# Altium PCB EN2091_Analog_Project_PCB.PcbDoc (part 1 of 2)
Units mm, origin at the board's own origin, x right, y up, seen from the top; angles counter-clockwise.
Board outline 100.01 x 60.01 mm, 2 copper layers (Top Layer, Bottom Layer); 44 components, 26 nets, 123 pads, 280 vias.
Unrouted connection lines stored in the file: 15.
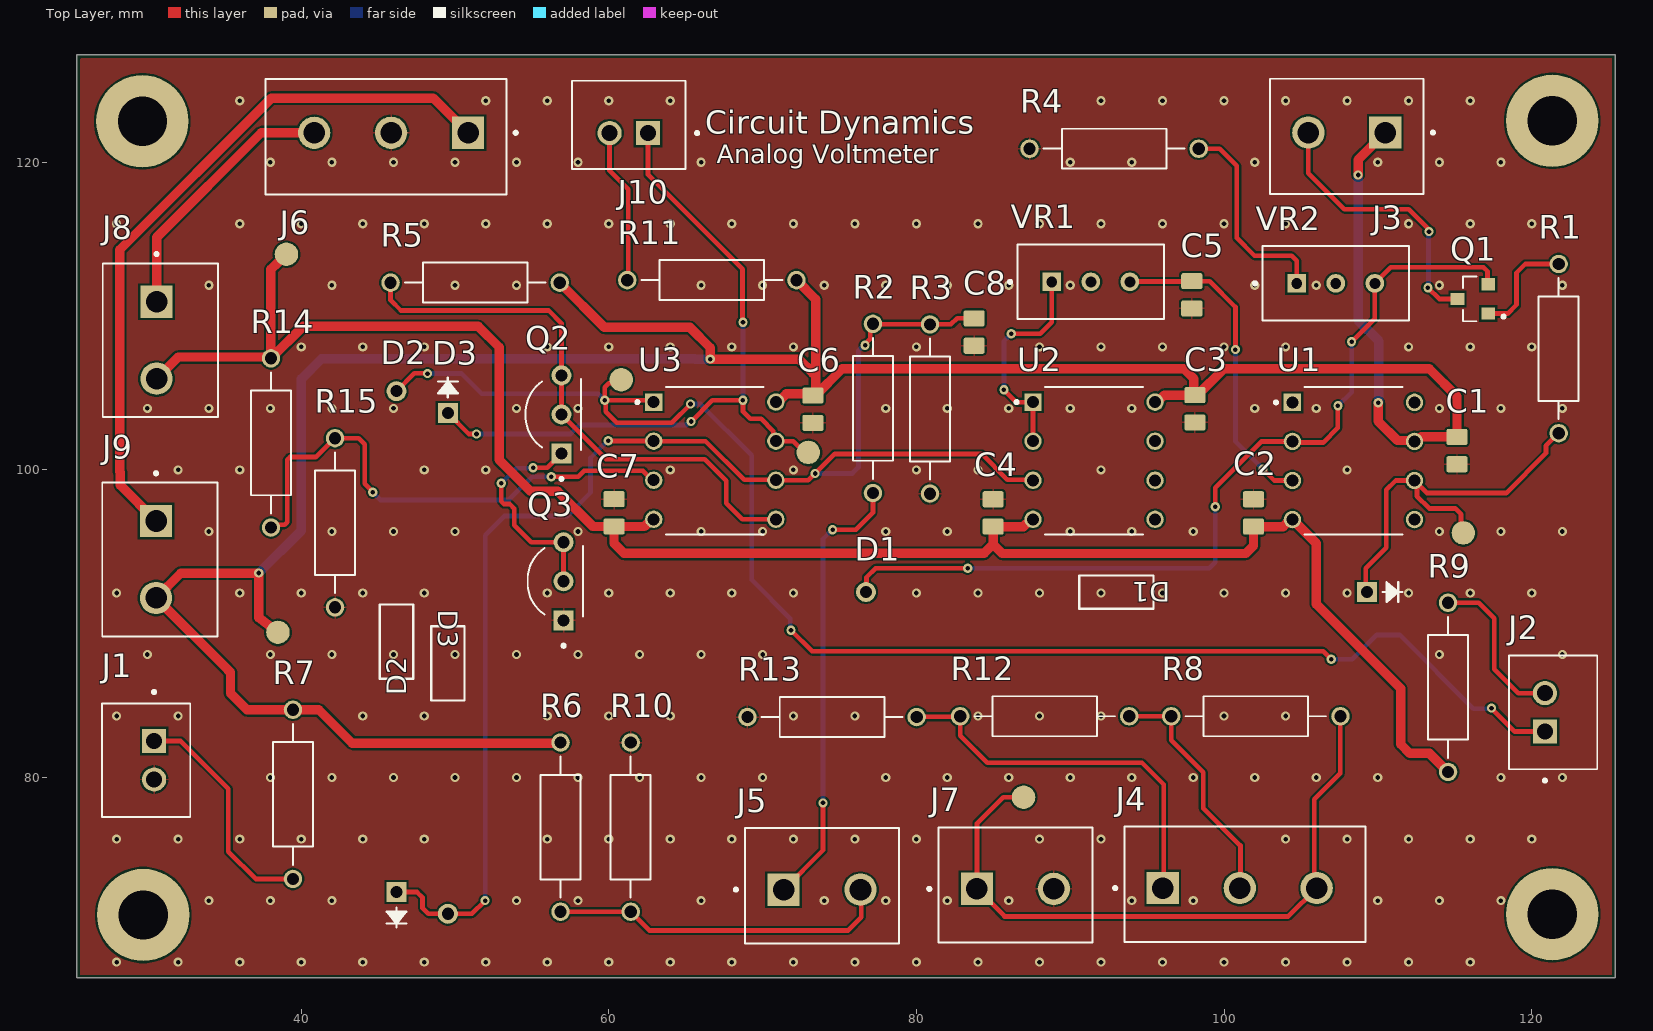
[diagram p0: Top Layer view]
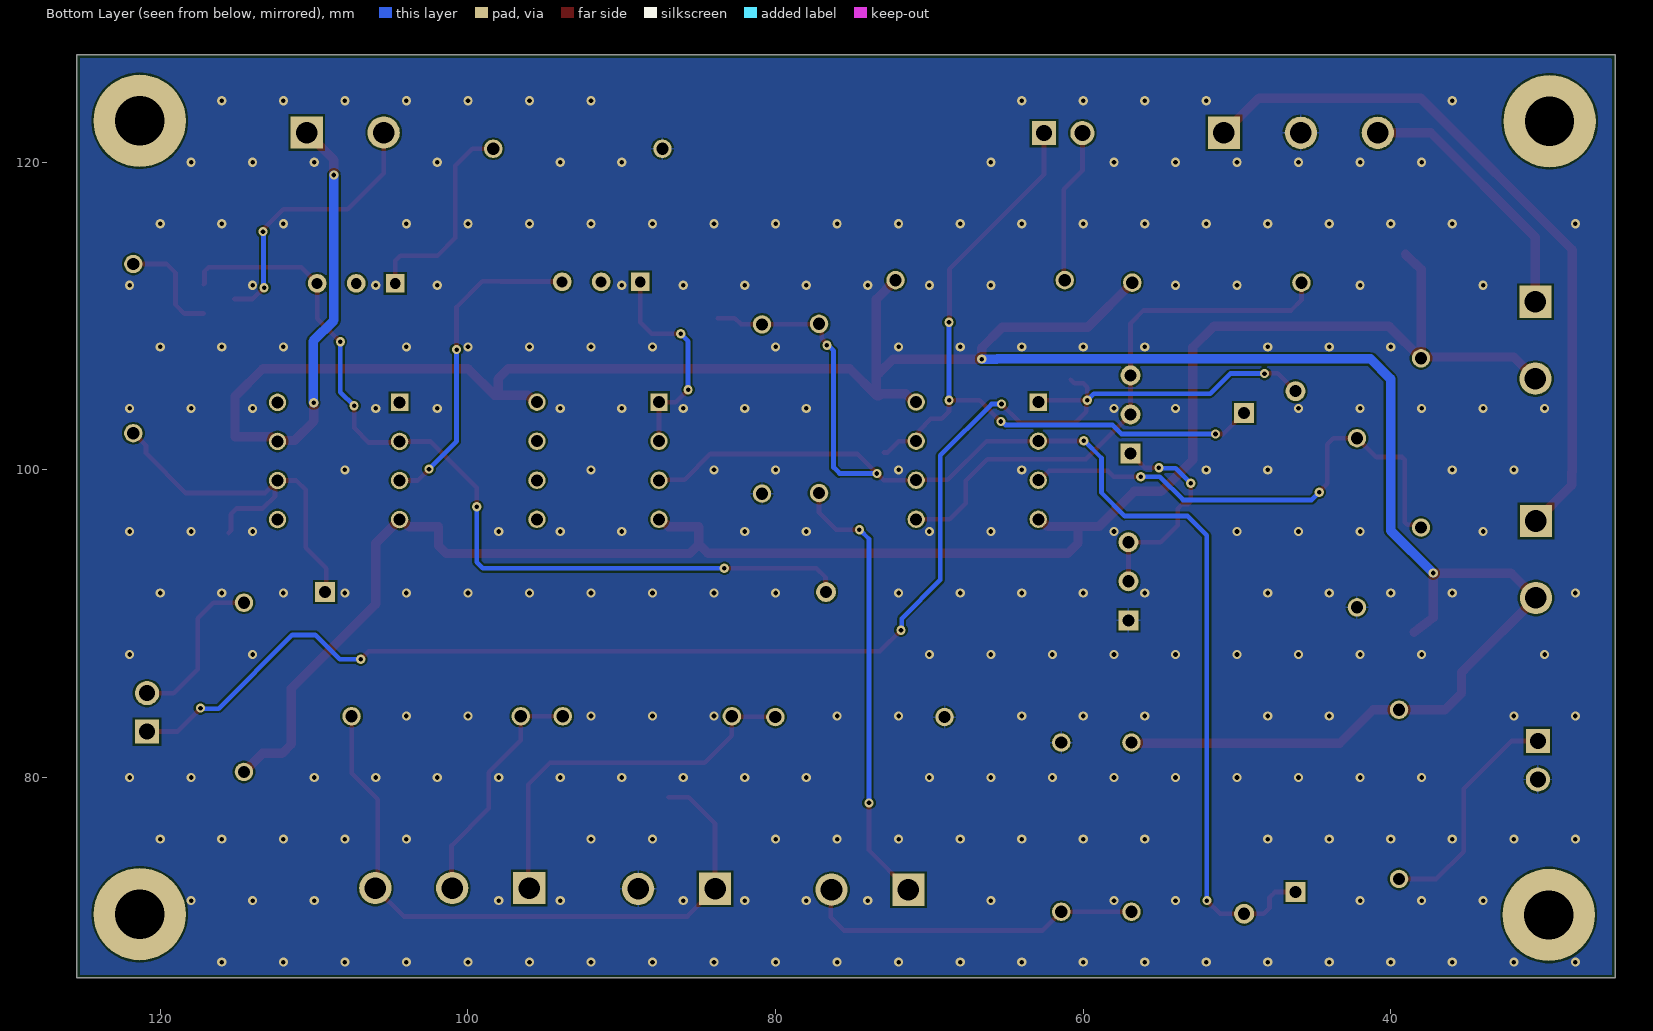
[diagram p1: Bottom Layer view, seen from below]

## Layer stack, top to bottom
Top Solder: solder mask 0.0102, Solder Resist, Dk 3.5
Top Layer: signal copper 0.0356
Dielectric 1: dielectric 0.32, FR-4, Dk 4.8
Bottom Layer: signal copper 0.0356
Bottom Solder: solder mask 0.0102, Solder Resist, Dk 3.5

## Board outline
25.419,66.977 25.419,126.982 25.418,126.983 125.425,126.983 125.425,66.977

## Design rules (kind name [scope] priority, off if disabled: settings)
BoardOutlineClearance [All] p1: gap=0.2 ignorepadtopadclearanceinfootprint=FALSE
Clearance [All] p1: gap=0.127 ignorepadtopadclearanceinfootprint=FALSE except(0.25: Arc-Hole Track-Hole SMDPad-Hole THPad-Hole Via-Hole Fill-Hole Poly-Hole Region-Hole Text-Hole)
ComponentClearance [All] p1: gap=0.127 collisioncheckmode=3 verticalgap=0.127 showdistances=TRUE
DiffPairsRouting [All] p1: maxlimit=0.254 minlimit=0.127 mostfreqgap=0.127 toplayer_minwidth=0.127 toplayer_maxwidth=25.4 toplayer_prefwidth=0.127 bottomlayer_minwidth=0.127 bottomlayer_maxwidth=25.4 bottomlayer_prefwidth=0.127 maxuncoupledlength=12.7
Height [All] p1: minheight=0 maxheight=1816.048 prefheight=12.7
HoleSize [All] p1: absolutevalues=TRUE maxlimit=6.3 minlimit=0.3 maxpercent=80.000 minpercent=20.000
HoleToHoleClearance [All] p1: gap=0.25 allowstackedmicrovias=FALSE
MinimumAnnularRing [All] p1: minimumring=0.076
MinimumSolderMaskSliver [All] p1: minsoldermaskwidth=0
PlaneClearance [All] p1: clearance=0.127
PlaneConnect PlaneConnectPowerPads [InPadClass('PowerPads')] p1: planeconnectstyle=Direct reliefexpansion=0.508 reliefentries=4 reliefconductorwidth=0.254 reliefairgap=0.254
PlaneConnect [All] p2: pad.planeconnectstyle=Relief pad.reliefexpansion=0.3 pad.reliefentries=4 pad.reliefconductorwidth=0.127 pad.reliefairgap=0.127 via.planeconnectstyle=Direct via.reliefexpansion=0.3 via.reliefentries=4 via.reliefconductorwidth=0.127 via.reliefairgap=0.127
PolygonConnect PolygonConnectPowerPads [All vs (InPadClass('PowerPads'))] p1: connectstyle=Direct reliefconductorwidth=0.254 reliefentries=4 polygonreliefangle="90 Angle" airgapwidth=0.254
PolygonConnect [All] p2: thpad.connectstyle=Relief thpad.reliefconductorwidth=0.127 thpad.reliefentries=4 thpad.polygonreliefangle="90 Angle" thpad.airgapwidth=0.127 smdpad.connectstyle=Relief smdpad.reliefconductorwidth=0.127 smdpad.reliefentries=4 smdpad.polygonreliefangle="90 Angle" smdpad.airgapwidth=0.127 via.connectstyle=Direct via.reliefconductorwidth=0.127 via.reliefentries=4 via.polygonreliefangle="90 Angle" via.airgapwidth=0.127
RoutingVias [All] p1: holewidth=0.3 width=0.6 viastyle="Through Hole" minholewidth=0.3 minwidth=0.6 maxholewidth=0.6 maxwidth=6.6
SilkToSilkClearance [All] p1: silktosilkclearance=0
SilkToSolderMaskClearance [IsPad] p1: minsilkscreentomaskgap=0.127 clearancetoexposedcopper=TRUE
SolderMaskExpansion [All] p1: expansion=0.075 istentingtop=FALSE
SupplyNets "Schematic Supply Nets_2" [InNet('GND')] p1: voltage=0.000
SupplyNets "Schematic Supply Nets_1" [InNet('+9V')] p2: voltage=0.000
SupplyNets "Schematic Supply Nets" [InNet('-9V')] p3: voltage=0.000
Width [All] p1: maxlimit=25.4 minlimit=0.127 preferedwidth=0.127 minimp=50.000000 maximp=50.000000 favimp=50.000000
20 further rules are at their usual default settings.

## Components (designator, comment, footprint, x,y, rotation, side; value= is the part's Value field where it differs from the comment)
C1 "100nF" CAPC2012X95N 115.145,101.259 r90 top
C2 "100nF" CAPC2012X95N 101.916,97.202 r90 top
C3 "100nF" CAPC2012X95N 98.109,103.975 r90 top
C4 "100nF" CAPC2012X95N 84.986,97.203 r90 top
C5 "1uF" CAPC2012X135N 97.904,111.385 r90 top
C6 "100nF" CAPC2012X95N 73.269,103.945 r90 top
C7 "100nF" CAPC2012X95N 60.341,97.211 r90 top
C8 "1uF" CAPC2012X135N 83.752,108.964 r90 top
D1 "1N4148" AXIAL_017AG_T26_ONS 109.282,92.058 r180 top
D2 "1N4148" AXIAL_017AG_T26_ONS 46.196,72.558 r90 top
D3 "1N4148" AXIAL_017AG_T26_ONS 49.537,103.705 r270 top
J1 "B2B-XH-A(LF)(SN)" JST_B2B-XH-A(LF)(SN) 29.913,81.123 r90 top
J2 "B2B-XH-A(LF)(SN)" JST_B2B-XH-A(LF)(SN) 121.389,84.239 r270 top
J3 "KF301-2P" HANDSON_KF301-2P 107.981,121.931 r180 top
J4 "KF301-5.0-3P-2P" HANDSON_KF301-3P 98.522,72.814 r0 top
J5 "KF301-2P" HANDSON_KF301-2P 73.863,72.714 r0 top
J6 "KF301-5.0-3P-2P" HANDSON_KF301-3P 48.347,121.92 r180 top
J7 "KF301-2P" HANDSON_KF301-2P 86.436,72.764 r0 top
J8 "KF301-2P" HANDSON_KF301-2P 30.599,108.435 r270 top
J9 "KF301-2P" HANDSON_KF301-2P 30.566,94.179 r270 top
J10 "B2B-XH-A(LF)(SN)" JST_B2B-XH-A(LF)(SN) 61.301,122.425 r0 top
Q1 "2N7002" TRANS_2N7002 116.174,111.115 r180 top
Q2 "2N3904" TO92254P460H750-3 56.921,103.605 r90 top
Q3 "2N3904" TO92254P460H750-3 57.059,92.759 r90 top
R1 "1kΩ" RESAD1100W55L680D260 121.756,107.888 r90 top
R2 "10kΩ" RESAD1100W55L680D260 77.172,103.997 r90 top
R3 "10MΩ" RESAD1100W55L680D260 80.882,103.961 r90 top
R4 "820Ω" RESAD1100W55L680D260 92.855,120.882 r0 top
R5 "47kΩ" RESAD1100W55L680D260 51.313,112.175 r180 top
R6 "180kΩ" RESAD1100W55L680D260 56.863,76.776 r90 top
R7 "4.7kΩ" RESAD1100W55L680D260 39.466,78.907 r270 top
R8 "2.7MΩ" RESAD1100W55L680D260 102.065,83.985 r0 top
R9 "2.2kΩ" RESAD1100W55L680D260 114.564,85.864 r90 top
R10 "20kΩ" RESAD1100W55L680D260 61.425,76.776 r270 top
R11 "2.2kΩ" RESAD1100W55L680D260 66.701,112.339 r180 top
R12 "200kΩ" RESAD1100W55L680D260 88.34,83.985 r0 top
R13 "100kΩ" RESAD1100W55L680D260 74.514,83.935 r0 top
R14 "100kΩ" RESAD1100W55L680D260 38.037,101.755 r90 top
R15 "820Ω" RESAD1100W55L680D260 42.201,96.562 r90 top
U1 "OP07CP" DIP794W45P254L959H508Q8 108.413,100.582 r0 top
U2 "TLO72CP" DIP794W45P254L959H508Q8 91.548,100.597 r0 top
U3 "TLO72CP" DIP794W45P254L959H508Q8 66.89,100.6 r0 top
VR1 "100kΩ" TRIM_3296W-1-104LF 91.338,112.228 r0 top
VR2 "100" TRIM_3296W-1-101 107.264,112.131 r0 top

## Footprints (in the part's own frame and the unit in brackets; to place one, negate y for a bottom-side part, rotate by r counter-clockwise, add the part's x,y. Pads: shape width x height; smd on the part's side, far side on the other; paste and mask are expansions set on the pad)
AXIAL_017AG_T26_ONS [mil]
  rect 51x51 hole 31 paste-99999 mask+0: 1(0,0)
  round 51 hole 31 paste-99999 mask+0: 2(1282,0)
  silkscreen extent -90,-42 736,43, body extent -11,-37 1292,37, height 75
CAPC2012X95N [mm]
  rrect25% 1.05x1.38 smd: 1(-0.888,0) 2(0.888,0)
  body extent -1,-0.63 1,0.63, height 0.95
CAPC2012X135N [mm]
  rrect25% 1.05x1.38 smd: 1(-0.888,0) 2(0.888,0)
  body extent -1,-0.63 1,0.63, height 1.35
DIP794W45P254L959H508Q8 [mm]
  rect 1.13x1.13 / inner round 1.13 / far side rect 1.13x1.13 hole 0.78 mask+0.102: 1(-3.97,3.81)
  round 1.13 hole 0.78 mask+0.102: 2(-3.97,1.27) 3(-3.97,-1.27) 4(-3.97,-3.81) 5(3.97,-3.81) 6(3.97,-1.27) 7(3.97,1.27) 8(3.97,3.81)
  silkscreen extent -5.13,-4.79 3.17,4.79, body extent -4.1,-4.79 4.1,4.79, height 5.08
HANDSON_KF301-2P [mm]
  rect 2.1x2.1 / inner round 2.1 / far side rect 2.1x2.1 hole 1.4: 1(-2.5,0)
  round 2.1 hole 1.4: 2(2.5,0)
  silkscreen extent -5.7,-3.5 5,4, body extent -5.6,-3.75 5,3.75, height 10
HANDSON_KF301-3P [mm]
  rect 2.1x2.1 / inner round 2.1 / far side rect 2.1x2.1 hole 1.4: 1(-2.5,0)
  round 2.1 hole 1.4: 2(2.5,0) 3(7.5,0)
  silkscreen extent -5.7,-3.5 10.67,4, body extent -5.6,-3.75 10.03,3.75, height 10
JST_B2B-XH-A(LF)(SN) [mm]
  rect 1.575x1.575 / inner round 1.575 / far side rect 1.575x1.575 hole 1.05: 1(1.25,-0.525)
  round 1.575 hole 1.05: 2(-1.25,-0.525)
  silkscreen extent -3.7,-2.88 4.54,2.88, body extent -3.7,-2.88 3.7,2.88, height 7
RESAD1100W55L680D260 [mm]
  round 1.2 hole 0.8: 1(-5.5,0) 2(5.5,0)
  silkscreen extent -4.58,-1.3 4.58,1.3, body extent -5.77,-1.2 5.77,1.2, height 2.4
TO92254P460H750-3 [mm]
  rect 1.298x1.298 / inner round 1.298 / far side rect 1.298x1.298 hole 0.79 mask+0.102: 1(-2.54,0)
  round 1.298 hole 0.79 mask+0.102: 2(0,0) 3(2.54,0)
  silkscreen extent -4.29,-1.27 2.3,2.33, body extent -2.74,-1.27 2.74,2.33, height 8.09
TRANS_2N7002 [mm]
  rect 0.9x0.8 smd paste+0 mask+0.102: 1(-1,0.95) 2(-1,-0.95) 3(1,0)
  silkscreen extent -2.1,-1.45 0.65,1.45, body extent -1.3,-1.52 1.3,1.52, height 1.3
TRIM_3296W-1-101 [mm]
  rect 1.218x1.218 / inner round 1.218 / far side rect 1.218x1.218 hole 0.71: 1(-2.54,0)
  round 1.218 hole 0.71: 2(0,0) 3(2.54,0)
  silkscreen extent -5.35,-2.41 4.76,2.42, body extent -4.76,-2.41 4.76,2.42, height 11.55
TRIM_3296W-1-104LF [mm]
  rect 1.218x1.218 / inner round 1.218 / far side rect 1.218x1.218 hole 0.71: 1(-2.54,0)
  round 1.218 hole 0.71: 2(0,0) 3(2.54,0)
  silkscreen extent -5.35,-2.41 4.76,2.42, body extent -4.76,-2.41 4.76,2.42, height 11.55

## Part data
C1 C2 C3 C4 C6 C7: library part CL21B104KBCNNNC, "100nF 50V X7R ±10% 0805 Multilayer Ceramic Capacitors MLCC - SMD/SMT ROHS", JLCPCB Part Number=C1711, Package="SMD-2 Samsung", Check_prices=https://www.snapeda.com/parts/CL21B104KBCNNNC/Samsung/view-part/?ref=eda, Datasheet=https://jlc-prod-smt.oss-eu-central-1.aliyuncs.com/smtDataManualFile/8586177282230652928-C1711.pdf?response-content-disposition=attachment%3B%20filename%3DC1711.pdf%3B%20filename%2A%3DUTF-8%27%27C1711.pdf&x-oss-date=20260824T081709Z&x-oss-expires=1800&x-oss-security-token=CAISgAN1q6Ft5B2yfSjIr5mGHfDOn7QT7o%2BxUBDlk1MZdulkpK3jlDz2IHhMdHJsAOodtv0%2FmmhT6PkclqRLcbhpcmfjV%2BZHzLB8qZEGg3sq557b16cNrbH4M4H6aXeirtuwDsz9SNTCALjPD3nPii50x5bjaDymRCbLGJaViJlhHLN1Ow6jdmhpCctxLAlvo9NgFxm3D%2Fu2NQPwiWf9FVdhvhEG6Vly8qOi2MaRmFy8yFTx0b0SvJ%2BjYMrmPctoN9JnSdC5mfdzau3a1TJ84gRD0a5wkaVA1zbDs5bfISEIuUzebreLqY03dV4mOvdqIcMe8qigz88fk%2FfIioH6xyxKOexoSCnFTOiiupCcQLPyao9jLu6iayqViY7QaIOTqQohZmkAMwVOasAsI3Ngh4zF97Qt0cVNkXO9gWfLI8DtuMleWgooUt9U86HD0eS19jklBdzSlusJRAJJUVBflCeKEaRNSAd3WGhEfM2%2BBt4QT30w5N2u00S8OSMI7RV3BqKWD5sagAGgO1DD6BoixGcj7OM8XS0gibNrLNvx9htutE794D0zttbwnpxTrwll4sF3BZcc4f4feWxI7%2Bt9GmtQtPB9CcN1OsLaOdxgI0xrNzXh3GP5koq13GIWxRMcGYuQFx2sstxck4NbO5PxcqvOTQCJgYZ8SZgvAsPo3E1SdW304xHJtyAA&x-oss-signature-version=OSS4-HMAC-SHA256&x-oss-credential=STS.NZ3VJzrk2YMZR6TwSLzfHKhHv%2F20260824%2Feu-central-1%2Foss%2Faliyun_v4_request&x-oss-signature=b522eb2391a6902924f48a327a7f41585dc420bf07b5c2db532034d436f7e6a7, LCSC Part Number=C1711, MF="Samsung Electro-Mechanics", MP=CL21B104KBCNNNC, Packaging=0805, SnapEDA_Link=https://www.snapeda.com/parts/CL21B104KBCNNNC/Samsung/view-part/?ref=snap
C5 C8: library part CL21B105KBFNNNE, "1uF 50V X7R ±10% 0805 Multilayer Ceramic Capacitors MLCC - SMD/SMT ROHS", JLCPCB Part Number=C28323, Package="SMD-2 Samsung", Check_prices=https://www.snapeda.com/parts/CL21B105KBFNNNE/Samsung/view-part/?ref=eda, LCSC Part Number=C28323, MF="Samsung Electro-Mechanics", MP=CL21B105KBFNNNE, Packaging=0805, SnapEDA_Link=https://www.snapeda.com/parts/CL21B105KBFNNNE/Samsung/view-part/?ref=snap
D1 D2 D3: "-55℃~+175℃@(Tj) 1 Independent 100V 1V@10mA 200mA 4A 4ns 500mW 5uA@75V DO-35 Switching Diodes ROHS", JLCPCB Part Number=C258182, Package="AXIAL LEAD-2 ON Semiconductor", Check_prices=https://www.snapeda.com/parts/1N4148/Onsemi/view-part/?ref=eda, ComponentLink1Description=Datasheet, ComponentLink1URL=https://jlc-prod-smt.oss-eu-central-1.aliyuncs.com/smtDataManualFile/8588891516693987328-C258182.pdf?response-content-disposition=attachment%3B%20filename%3DC258182.pdf%3B%20filename%2A%3DUTF-8%27%27C258182.pdf&x-oss-date=20260824T123915Z&x-oss-expires=1800&x-oss-security-token=CAISgAN1q6Ft5B2yfSjIr5nHLfzkqI4Zj7uFb1Hwr3kzdMRFu6LJ0Dz2IHhMdHJsAOodtv0%2FmmhT6PkclqRLcbhpcmfjV%2BZHzLB8qb4h%2FEIq557b16cNrbH4M4H6aXeirtuwDsz9SNTCALjPD3nPii50x5bjaDymRCbLGJaViJlhHLN1Ow6jdmhpCctxLAlvo9NgFxm3D%2Fu2NQPwiWf9FVdhvhEG6Vly8qOi2MaRmFy8yFTx0b0SvJ%2BjYMrmPctoN9JnSdC5mfdzau3a1TJ84gRD0a5wkaVA1zbDs5bfISEIuUzebreLqY03dV4mOvdqIcMe8qigz88fk%2FfIioH6xyxKOexoSCnFTOiiupCcQLPyao9jLu6iayqViY7QaIOTqQohZmkAMwVOasAsI3Ngh4zF97Qt0cVNkXO9gWfLI8DtuMleWkqnSf1c86HD0eS19jklBdzSlusJRAJJUVBflCeKEaRNSAd3WGhEfM2%2BBt4QT30w5N2u00S8OSMI7u2NB6KWD5sagAGr3foMo08u0hg4sPaEAhHejaX1K1vtCq0Rs3qdLPQjOHAU3bA2D2pDPhPzXRnKBDFNRw25yQAe0B8ZutJyzVczHfRc5aN9y5%2BVFQff1we5D3ylmkox3228fiPTPzdY0dulDcVIUusk1MruY%2FGuZ4TocXsP7T7%2BnIgiC75d%2B8yAUSAA&x-oss-signature-version=OSS4-HMAC-SHA256&x-oss-credential=STS.NZrfFPEQ88ynmwAKyfxKiTgb2%2F20260824%2Feu-central-1%2Foss%2Faliyun_v4_request&x-oss-signature=7d31f57c4ca03725e030b844e767f49808b97d5660530bc99b6cfe814330b3c1, LCSC Part Number=C258182, MF=onsemi, MP=1N4148, Packaging=DO-35, SnapEDA_Link=https://www.snapeda.com/parts/1N4148/Onsemi/view-part/?ref=snap
J1 J2 J10: "Connector Header Through Hole 2 position 0.098 (2.50mm)", JLCPCB Part Number=C51940134, Package=None, Check_prices=https://www.snapeda.com/parts/B2B-XH-A(LF)(SN)/JST/view-part/?ref=eda, ComponentLink1Description=Datasheet, ComponentLink1URL=https://jlc-prod-smt.oss-eu-central-1.aliyuncs.com/smtDataManualFile/8756873389292032000-C51940134.pdf?response-content-disposition=attachment%3B%20filename%3DC51940134.pdf%3B%20filename%2A%3DUTF-8%27%27C51940134.pdf&x-oss-date=20260825T073214Z&x-oss-expires=1800&x-oss-security-token=CAISgAN1q6Ft5B2yfSjIr5vHL4nsm71Gw%2FTYUEzanjcPNNsbqIb5oTz2IHhMdHJsAOodtv0%2FmmhT6PkclqRLcbhpcmfjV%2BZHzLB8qfZMiiAq557b16cNrbH4M4H6aXeirtuwDsz9SNTCALjPD3nPii50x5bjaDymRCbLGJaViJlhHLN1Ow6jdmhpCctxLAlvo9NgFxm3D%2Fu2NQPwiWf9FVdhvhEG6Vly8qOi2MaRmFy8yFTx0b0SvJ%2BjYMrmPctoN9JnSdC5mfdzau3a1TJ84gRD0a5wkaVA1zbDs5bfISEIuUzebreLqY03dV4mOvdqIcMe8qigz88fk%2FfIioH6xyxKOexoSCnFTOiiupCcQLPyao9jLu6iayqViY7QaIOTqQohZmkAMwVOasAsI3Ngh4zF97Qt0cVNkXO9gWfLI8DtuMleWmpmXdk%2B86HD0eS19jklBdzSlusJRAJJUVBflCeKEaRNSAd3WGhEfM2%2BBt4QT30w5N2u00S8OSMIxfnStaKWD5sagAGDiiDi0jkdUes8cqMbd0CGciys9ki7pIZkKsKqj9ZCxgmTVFKmonOvhB0GCq%2B31OjjHM0VTB2zOVgjvkRo1ZZOD%2FLtMbwaPXos31FS3eqvfpK6qEPBU1QuFMi8nemEpSEsfpKHEGo3PQQniW1S1jM94Dta3jYoawqx25WNx82BmSAA&x-oss-signature-version=OSS4-HMAC-SHA256&x-oss-credential=STS.NXrd3Xvbgt63Rjkz7Z8T7GCRC%2F20260825%2Feu-central-1%2Foss%2Faliyun_v4_request&x-oss-signature=ea0af44fa6bb8676878fee5e34cce7cfde54a6f68248ff1658e78184a3f7ef54, LCSC Part Number=C51940134, MF=XYECONN, MP=XY-B2B-XH-A, SnapEDA_Link=https://www.snapeda.com/parts/B2B-XH-A(LF)(SN)/JST/view-part/?ref=snap
J3 J5 J7 J8 J9: "2 Pin Terminal Block 5mm Pitch /  / -30℃~+120℃ 1 1.5 14~22 17A 1x2P 2 250V 2P 5mm Blue Through Hole 插件,P=5mm Screw Terminal Blocks ROHS", JLCPCB Part Number=C474881, Package=None, Check_prices=https://www.snapeda.com/parts/KF301-2P/Handson+Technology/view-part/?ref=eda, ComponentLink1Description=Datasheet, ComponentLink1URL=https://jlc-prod-smt.oss-eu-central-1.aliyuncs.com/smtDataManualFile/8588888669994561536-C474881.pdf?response-content-disposition=attachment%3B%20filename%3DC474881.pdf%3B%20filename%2A%3DUTF-8%27%27C474881.pdf&x-oss-date=20260825T075455Z&x-oss-expires=1800&x-oss-security-token=CAISgAN1q6Ft5B2yfSjIr5vHL4nsm71Gw%2FTYUEzanjcPNNsbqIb5oTz2IHhMdHJsAOodtv0%2FmmhT6PkclqRLcbhpcmfjV%2BZHzLB8qfZMiiAq557b16cNrbH4M4H6aXeirtuwDsz9SNTCALjPD3nPii50x5bjaDymRCbLGJaViJlhHLN1Ow6jdmhpCctxLAlvo9NgFxm3D%2Fu2NQPwiWf9FVdhvhEG6Vly8qOi2MaRmFy8yFTx0b0SvJ%2BjYMrmPctoN9JnSdC5mfdzau3a1TJ84gRD0a5wkaVA1zbDs5bfISEIuUzebreLqY03dV4mOvdqIcMe8qigz88fk%2FfIioH6xyxKOexoSCnFTOiiupCcQLPyao9jLu6iayqViY7QaIOTqQohZmkAMwVOasAsI3Ngh4zF97Qt0cVNkXO9gWfLI8DtuMleWmpmXdk%2B86HD0eS19jklBdzSlusJRAJJUVBflCeKEaRNSAd3WGhEfM2%2BBt4QT30w5N2u00S8OSMIxfnStaKWD5sagAGDiiDi0jkdUes8cqMbd0CGciys9ki7pIZkKsKqj9ZCxgmTVFKmonOvhB0GCq%2B31OjjHM0VTB2zOVgjvkRo1ZZOD%2FLtMbwaPXos31FS3eqvfpK6qEPBU1QuFMi8nemEpSEsfpKHEGo3PQQniW1S1jM94Dta3jYoawqx25WNx82BmSAA&x-oss-signature-version=OSS4-HMAC-SHA256&x-oss-credential=STS.NXrd3Xvbgt63Rjkz7Z8T7GCRC%2F20260825%2Feu-central-1%2Foss%2Faliyun_v4_request&x-oss-signature=bbaa85c5a5c7e0f3858a29c7e7e1ce60f942b031d33e9564a46d8b874bcb652f, LCSC Part Number=C474881, MF="Handson Technology", MP=KF301-2P, SnapEDA_Link=https://www.snapeda.com/parts/KF301-2P/Handson+Technology/view-part/?ref=snap
J4 J6: library part KF301-5.0-3P, "-30℃~+120℃ 1 1.5 14~22 17A 1x3P 250V 3 3P 5mm Blue Through Hole 插件,P=5mm Screw Terminal Blocks ROHS", JLCPCB Part Number=C474882, Package=None, ComponentLink1Description=Datasheet, ComponentLink1URL=https://jlc-prod-smt.oss-eu-central-1.aliyuncs.com/smtDataManualFile/8588888670002139136-C474882.pdf?response-content-disposition=attachment%3B%20filename%3DC474882.pdf%3B%20filename%2A%3DUTF-8%27%27C474882.pdf&x-oss-date=20260825T083909Z&x-oss-expires=1800&x-oss-security-token=CAISgAN1q6Ft5B2yfSjIr5rwIOuAjLBXwqqKMWTCgWMCOtsegaHIujz2IHhMdHJsAOodtv0%2FmmhT6PkclqRLcbhpcmfjV%2BZHzLB8qZALwSEq557b16cNrbH4M4H6aXeirtuwDsz9SNTCALjPD3nPii50x5bjaDymRCbLGJaViJlhHLN1Ow6jdmhpCctxLAlvo9NgFxm3D%2Fu2NQPwiWf9FVdhvhEG6Vly8qOi2MaRmFy8yFTx0b0SvJ%2BjYMrmPctoN9JnSdC5mfdzau3a1TJ84gRD0a5wkaVA1zbDs5bfISEIuUzebreLqY03dV4mOvdqIcMe8qigz88fk%2FfIioH6xyxKOexoSCnFTOiiupCcQLPyao9jLu6iayqViY7QaIOTqQohZmkAMwVOasAsI3Ngh4zF97Qt0cVNkXO9gWfLI8DtuMleWgrAlsTAJjvyAFpORa%2Bb5wchMHn6pr9EWOXuJZUIn3b%2FstWNupKq5ldctHSeoXq108CXVnU5PXYIxekA9aKWD5sagAEUyPntyVyU4V2IqafEejF6luaUGOW8giT03zBmI%2F4BLLNNju2GWhPwbRm8GlAGTmkaDwxIN4%2Bg6sd2cUpZg6tRnuiIoRrRfPgk9f8sDOnBhHkSyvlZEJc0XYnr%2F5yKzo8GBOg%2BMmFY724RtfEMwd4PQLZAoVJL30q4tKoTMBKqVSAA&x-oss-signature-version=OSS4-HMAC-SHA256&x-oss-credential=STS.NYEkQ4aovuha3BsecW6T2ndcX%2F20260825%2Feu-central-1%2Foss%2Faliyun_v4_request&x-oss-signature=8e8a3bf5e7e8f5cc52ed862cda921fd13cbe209f163a0669e8eafba254ac342d, LCSC Part Number=C474882, MF="Cixi Kefa Elec", MP=KF301-5.0-3P
Q1: "MOSFET, SOT-23, N, 60V, 0.28A, 5", JLCPCB Part Number=C8545, Package="SOT-23 Diotec", Check_prices=https://www.snapeda.com/parts/2N7002/Diotec/view-part/?ref=eda, ComponentLink1Description=Datasheet, ComponentLink1URL=https://jlc-prod-smt.oss-eu-central-1.aliyuncs.com/smtDataManualFile/8550724090240786432-C8545.pdf?response-content-disposition=attachment%3B%20filename%3DC8545.pdf%3B%20filename%2A%3DUTF-8%27%27C8545.pdf&x-oss-date=20260824T115715Z&x-oss-expires=1800&x-oss-security-token=CAISgAN1q6Ft5B2yfSjIr5nXMuv%2BvJV0wLuud0CI01ctdutUt%2FLArjz2IHhMdHJsAOodtv0%2FmmhT6PkclqRLcbhpcmfjV%2BZHzLB8qYl7pX0q557b16cNrbH4M4H6aXeirtuwDsz9SNTCALjPD3nPii50x5bjaDymRCbLGJaViJlhHLN1Ow6jdmhpCctxLAlvo9NgFxm3D%2Fu2NQPwiWf9FVdhvhEG6Vly8qOi2MaRmFy8yFTx0b0SvJ%2BjYMrmPctoN9JnSdC5mfdzau3a1TJ84gRD0a5wkaVA1zbDs5bfISEIuUzebreLqY03dV4mOvdqIcMe8qigz88fk%2FfIioH6xyxKOexoSCnFTOiiupCcQLPyao9jLu6iayqViY7QaIOTqQohZmkAMwVOasAsI3Ngh4zF97Qt0cVNkXO9gWfLI8DtuMleWorpROZs86HD0eS19jklBdzSlusJRAJJUVBflCeKEaRNSAd3WGhEfM2%2BBt4QT30w5N2u00S8OSMIdZUZHKKWD5sagAGIeDksTl0Jm8kDpNZyqXpos4Fia7krhozzbA5lHdi6hZhStnsllffk9Jy6LPikYdJXwHUZMD5tauOV%2FJMMuvlTmOopNPyucKakhx7CKF22jSXQNt5usakIFMasHgZAabS%2FMCHZQVcujW3F%2B80DFAHUjbh%2B1%2FCP8kr3l2njSUlPuCAA&x-oss-signature-version=OSS4-HMAC-SHA256&x-oss-credential=STS.NZbyQJQJUwyEuf97WxzdxX7kL%2F20260824%2Feu-central-1%2Foss%2Faliyun_v4_request&x-oss-signature=f53d934e69d13818cb32edbd0d068395a096e2f8396aa90dd858349e40b679ed, LCSC Part Number=C8545, MF="Diotec Semiconductor", MP=2N7002, Packaging=SOT-23, SnapEDA_Link=https://www.snapeda.com/parts/2N7002/Diotec/view-part/?ref=snap
Q2 Q3: "1 NPN 100 200mA 300MHz 300mV 40V 50nA 625mW 6V NPN TO-92 Bipolar (BJT) ROHS", JLCPCB Part Number=C118538, Package="TO-92 Diotec", Check_prices=https://www.snapeda.com/parts/2N3904/Diotec/view-part/?ref=eda, ComponentLink1Description=Datasheet, ComponentLink1URL=https://jlc-prod-smt.oss-eu-central-1.aliyuncs.com/smtDataManualFile/8588887652326387712-C118538.pdf?response-content-disposition=attachment%3B%20filename%3DC118538.pdf%3B%20filename%2A%3DUTF-8%27%27C118538.pdf&x-oss-date=20260911T151354Z&x-oss-expires=1800&x-oss-security-token=CAISgAN1q6Ft5B2yfSjIr5r9CI7lmOhw0YeyZVLIjkcBdcR9gfOa0Dz2IHhMdHJsAOodtv0%2FmmhT6PkclqRLcbhpcmfjV%2BZHzLB8qfNbr2kg557b16cNrbH4M4H6aXeirtuwDsz9SNTCALjPD3nPii50x5bjaDymRCbLGJaViJlhHLN1Ow6jdmhpCctxLAlvo9NgFxm3D%2Fu2NQPwiWf9FVdhvhEG6Vly8qOi2MaRmFy8yFTx0b0SvJ%2BjYMrmPctoN9JnSdC5mfdzau3a1TJ84gRD0a5wkaVA1zbDs5bfISEIuUzebreLqY03dV4mOvdqIcMe8qigz88fk%2FfIioH6xyxKOexoSCnFTOiiupCcQLPyao9jLu6iayqViY7QaIOTqQohZmkAMwVOasAsI3Ngh4zF97Qt0cVNkXO9gWfLI8DtuMleWmpsRHD7MjvyAFpORa%2Bb5wchMHn6pr9EWOXuJZUIn3b%2FstWNupKq5ldctHSeoXq108CXVnU5PXYIwBNhyqKWD5sagAG1Z1Ko3snZsjO1a1IJYsOspEmZv0%2BXU7OWdkAiwCQrcVVnAyAHbGZ8aZQx2jgys%2BVPP%2BjAliJD6sDK0ERwYbIs0pE%2F%2FOGQAkhN6WXgpQltR1W2sWSdxX5ATy6ua1TtneTFxF379HftCAEbgKOmHPbiz9tzW%2FV9N%2FCwVMnmnzFeoCAA&x-oss-signature-version=OSS4-HMAC-SHA256&x-oss-credential=STS.NYHC4Qu7QfEYgtyjGTyKQn612%2F20260911%2Feu-central-1%2Foss%2Faliyun_v4_request&x-oss-signature=5f7e3dfff60f0fba263af33bfa5ea5d7b517f9c0befd2510f0af956be3220f3d, LCSC Part Number=C118538, MF="Diotec Semiconductor", MP=2N3904, Packaging=TO-92, SnapEDA_Link=https://www.snapeda.com/parts/2N3904/Diotec/view-part/?ref=snap
R1: library part MFR-25FTE52-1K, "-55℃~+155℃ 1kΩ 250mW Metal Film Resistor ±1% ±50ppm/℃ 插件,D2.4xL6.3mm Through Hole Resistors ROHS", JLCPCB Part Number=C172978, Manufacturer=YAGEO, Package=Plugin,D2.4xL6.3mm, ComponentLink1Description=Footprint, ComponentLink1URL=https://jlc-prod-smt.oss-eu-central-1.aliyuncs.com/smtDataManualFile/8755423044993605632-C172978.pdf?response-content-disposition=attachment%3B%20filename%3DC172978.pdf%3B%20filename%2A%3DUTF-8%27%27C172978.pdf&x-oss-date=20260906T111132Z&x-oss-expires=1800&x-oss-security-token=CAISgAN1q6Ft5B2yfSjIr5nac%2Bnsjo1T4LGgNU%2FHnTM8eNdtpKDsuzz2IHhMdHJsAOodtv0%2FmmhT6PkclqRLcbhpcmfjV%2BZHzLB8qaYz1FQu557b16cNrbH4M4H6aXeirtuwDsz9SNTCALjPD3nPii50x5bjaDymRCbLGJaViJlhHLN1Ow6jdmhpCctxLAlvo9NgFxm3D%2Fu2NQPwiWf9FVdhvhEG6Vly8qOi2MaRmFy8yFTx0b0SvJ%2BjYMrmPctoN9JnSdC5mfdzau3a1TJ84gRD0a5wkaVA1zbDs5bfISEIuUzebreLqY03dV4mOvdqIcMe8qigz88fk%2FfIioH6xyxKOexoSCnFTOiiupCcQLPyao9jLu6iayqViY7QaIOTqQohZmkAMwVOasAsI3Ngh4zF97Qt0cVNkXO9gWfLI8DtuMleWspmx%2Fhm46HD0eS19jklBdzSlusJRAJJUVBflCeKEaRNSAd3WGhEfM2%2BBt4QT30w5N2u00S8OSMImLNMX6KWD5sagAGnBS1pJyigTrIAotemE2%2FZAj5lpuflU6Cx1ne3PKYeUSgx29L1tnEKEw7bHJH4L%2BwcyBF5TIPkAe9wQLoDG2IH%2B7vbpIM5MvPYfjzBbZEibCKyAmKr6BN784HCib%2BC8bhBZ5WQgh34wHbh24tRPUkJ5x6XXfvl0zb7VCnsoRLFQiAA&x-oss-signature-version=OSS4-HMAC-SHA256&x-oss-credential=STS.NZo8SXcRrWsK7ivy3itXAKeGY%2F20260906%2Feu-central-1%2Foss%2Faliyun_v4_request&x-oss-signature=4a93038927de780a1167e2fdc17bc64734a2c7f8ed724f4b04540bf5e082abb1, LCSC Part Number=C172978, Manufacturer Part Number=MFR-25FTE52-1K
R2: library part MFR-25FTE52-10K, "10kΩ 250V 250mW Metal Film Resistor ±1% ±50ppm/℃ 插件,D2.2xL6.5mm Through Hole Resistors ROHS", JLCPCB Part Number=C172967, Manufacturer=YAGEO, ComponentLink1Description=Footprint, ComponentLink1URL=https://jlc-prod-smt.oss-eu-central-1.aliyuncs.com/smtDataManualFile/8588887064650141696-C57436.pdf?response-content-disposition=attachment%3B%20filename%3DC57436.pdf%3B%20filename%2A%3DUTF-8%27%27C57436.pdf&x-oss-date=20260906T101707Z&x-oss-expires=1800&x-oss-security-token=CAISgAN1q6Ft5B2yfSjIr5vSO4%2FhhZxI%2Bq2YSHX0pTQQY%2BQe2%2FboiDz2IHhMdHJsAOodtv0%2FmmhT6PkclqRLcbhpcmfjV%2BZHzLB8qZREnVcu557b16cNrbH4M4H6aXeirtuwDsz9SNTCALjPD3nPii50x5bjaDymRCbLGJaViJlhHLN1Ow6jdmhpCctxLAlvo9NgFxm3D%2Fu2NQPwiWf9FVdhvhEG6Vly8qOi2MaRmFy8yFTx0b0SvJ%2BjYMrmPctoN9JnSdC5mfdzau3a1TJ84gRD0a5wkaVA1zbDs5bfISEIuUzebreLqY03dV4mOvdqIcMe8qigz88fk%2FfIioH6xyxKOexoSCnFTOiiupCcQLPyao9jLu6iayqViY7QaIOTqQohZmkAMwVOasAsI3Ngh4zF97Qt0cVNkXO9gWfLI8DtuMleWgpiXuNG46HD0eS19jklBdzSlusJRAJJUVBflCeKEaRNSAd3WGhEfM2%2BBt4QT30w5N2u00S8OSMIYHF9RqKWD5sagAGbau%2Fxe%2BD2roMehcOdm0PLMv7W398Wd9qW6auWIGOJ8yM2mufMKnNuzKDZRrB2n8xqRfVoivNI%2BCfeVUSVLsJDjlvzZ31AQToMdhBOrAOSV9wuJpTD8m86LQRz159fZvu2CuBzwfmd%2B8wbWeOtwDoLyWx%2Bd%2F0Ka0FLrv%2FIvuL9IyAA&x-oss-signature-version=OSS4-HMAC-SHA256&x-oss-credential=STS.NXgp5UhCiMosJSEA4Eok243Cj%2F20260906%2Feu-central-1%2Foss%2Faliyun_v4_request&x-oss-signature=a373059562e0e3dfbc50b7320e961e4699e31ef87cd4af9f5203c76fec99a3de, LCSC Part Number=C172967, Manufacturer Part Number=MFR-25FTE52-10K, Package=https://jlc-prod-smt.oss-eu-central-1.aliyuncs.com/smtDataManualFile/8755418945577209856-C172967.pdf?response-content-disposition=attachment%3B%20filename%3DC172967.pdf%3B%20filename%2A%3DUTF-8%27%27C172967.pdf&x-oss-date=20260906T105853Z&x-oss-expires=1800&x-oss-security-token=CAISgAN1q6Ft5B2yfSjIr5vSO4%2FhhZxI%2Bq2YSHX0pTQQY%2BQe2%2FboiDz2IHhMdHJsAOodtv0%2FmmhT6PkclqRLcbhpcmfjV%2BZHzLB8qZREnVcu557b16cNrbH4M4H6aXeirtuwDsz9SNTCALjPD3nPii50x5bjaDymRCbLGJaViJlhHLN1Ow6jdmhpCctxLAlvo9NgFxm3D%2Fu2NQPwiWf9FVdhvhEG6Vly8qOi2MaRmFy8yFTx0b0SvJ%2BjYMrmPctoN9JnSdC5mfdzau3a1TJ84gRD0a5wkaVA1zbDs5bfISEIuUzebreLqY03dV4mOvdqIcMe8qigz88fk%2FfIioH6xyxKOexoSCnFTOiiupCcQLPyao9jLu6iayqViY7QaIOTqQohZmkAMwVOasAsI3Ngh4zF97Qt0cVNkXO9gWfLI8DtuMleWgpiXuNG46HD0eS19jklBdzSlusJRAJJUVBflCeKEaRNSAd3WGhEfM2%2BBt4QT30w5N2u00S8OSMIYHF9RqKWD5sagAGbau%2Fxe%2BD2roMehcOdm0PLMv7W398Wd9qW6auWIGOJ8yM2mufMKnNuzKDZRrB2n8xqRfVoivNI%2BCfeVUSVLsJDjlvzZ31AQToMdhBOrAOSV9wuJpTD8m86LQRz159fZvu2CuBzwfmd%2B8wbWeOtwDoLyWx%2Bd%2F0Ka0FLrv%2FIvuL9IyAA&x-oss-signature-version=OSS4-HMAC-SHA256&x-oss-credential=STS.NXgp5UhCiMosJSEA4Eok243Cj%2F20260906%2Feu-central-1%2Foss%2Faliyun_v4_request&x-oss-signature=027985dfe1697d3c93addd91df9663f85f41fcc0b4f91978383751338c84ded9
R3: library part HHV-25FR-52-10M, "-55℃~+155℃ 1.6kV 10MΩ 250mW Metal Film Resistors ±1% ±200ppm/℃ 插件,D2.4xL6.3mm Through Hole Resistors ROHS", JLCPCB Part Number=C1741175, Manufacturer=YAGEO, Package=Plugin,D2.4xL6.3mm, ComponentLink1Description=Footprint, ComponentLink1URL=https://jlc-prod-smt.oss-eu-central-1.aliyuncs.com/smtDataManualFile/8755328648436031488-C1741175.pdf?response-content-disposition=attachment%3B%20filename%3DC1741175.pdf%3B%20filename%2A%3DUTF-8%27%27C1741175.pdf&x-oss-date=20260906T094949Z&x-oss-expires=1800&x-oss-security-token=CAISgAN1q6Ft5B2yfSjIr5rWeez%2Fv7lC0IiPa1bwvEoAT71Ol5bD1zz2IHhMdHJsAOodtv0%2FmmhT6PkclqRLcbhpcmfjV%2BZHzLB8qb4bx1Eu557b16cNrbH4M4H6aXeirtuwDsz9SNTCALjPD3nPii50x5bjaDymRCbLGJaViJlhHLN1Ow6jdmhpCctxLAlvo9NgFxm3D%2Fu2NQPwiWf9FVdhvhEG6Vly8qOi2MaRmFy8yFTx0b0SvJ%2BjYMrmPctoN9JnSdC5mfdzau3a1TJ84gRD0a5wkaVA1zbDs5bfISEIuUzebreLqY03dV4mOvdqIcMe8qigz88fk%2FfIioH6xyxKOexoSCnFTOiiupCcQLPyao9jLu6iayqViY7QaIOTqQohZmkAMwVOasAsI3Ngh4zF97Qt0cVNkXO9gWfLI8DtuMleWkonxNcG46HD0eS19jklBdzSlusJRAJJUVBflCeKEaRNSAd3WGhEfM2%2BBt4QT30w5N2u00S8OSMInBxK8qKWD5sagAE4UE4gskISDgkkmUOAOqQkmxDERSgRapehmtIyqiUnmINqf%2Fe7mduu7Yr1h7WdN14VCvYzNhyIHZnwotTufqqI9gqQmPxd7MybCmWa9YrQOa6FH4HxAfg%2FPn30MZ%2BuqC8fyTltcZzXzlZfTkArX8MWh2hCnLGuQWVjeheR9INpwyAA&x-oss-signature-version=OSS4-HMAC-SHA256&x-oss-credential=STS.NYc2VKRfcgJdipAXJUC2bxSh5%2F20260906%2Feu-central-1%2Foss%2Faliyun_v4_request&x-oss-signature=c9bb8ade5495b9c36b4e24ae95a96a0ffed89de77ee1bfec24146fbeec18ca78, LCSC Part Number=C1741175, Manufacturer Part Number=HHV-25FR-52-10M
R4 R15: library part MFR-25FRF52-820R, "-55℃~+155℃ 250mW 820Ω Metal Film Resistor ±1% ±100ppm/℃ 插件,D2.4xL6.3mm Through Hole Resistors ROHS", JLCPCB Part Number=C1743583, Manufacturer=YAGEO, Package=Plugin,D2.4xL6.3mm, ComponentLink1Description=Footprint, ComponentLink1URL=https://jlc-prod-smt.oss-eu-central-1.aliyuncs.com/smtDataManualFile/8755394679539929088-C1743583.pdf?response-content-disposition=attachment%3B%20filename%3DC1743583.pdf%3B%20filename%2A%3DUTF-8%27%27C1743583.pdf&x-oss-date=20260906T111339Z&x-oss-expires=1800&x-oss-security-token=CAISgAN1q6Ft5B2yfSjIr5nac%2Bnsjo1T4LGgNU%2FHnTM8eNdtpKDsuzz2IHhMdHJsAOodtv0%2FmmhT6PkclqRLcbhpcmfjV%2BZHzLB8qaYz1FQu557b16cNrbH4M4H6aXeirtuwDsz9SNTCALjPD3nPii50x5bjaDymRCbLGJaViJlhHLN1Ow6jdmhpCctxLAlvo9NgFxm3D%2Fu2NQPwiWf9FVdhvhEG6Vly8qOi2MaRmFy8yFTx0b0SvJ%2BjYMrmPctoN9JnSdC5mfdzau3a1TJ84gRD0a5wkaVA1zbDs5bfISEIuUzebreLqY03dV4mOvdqIcMe8qigz88fk%2FfIioH6xyxKOexoSCnFTOiiupCcQLPyao9jLu6iayqViY7QaIOTqQohZmkAMwVOasAsI3Ngh4zF97Qt0cVNkXO9gWfLI8DtuMleWspmx%2Fhm46HD0eS19jklBdzSlusJRAJJUVBflCeKEaRNSAd3WGhEfM2%2BBt4QT30w5N2u00S8OSMImLNMX6KWD5sagAGnBS1pJyigTrIAotemE2%2FZAj5lpuflU6Cx1ne3PKYeUSgx29L1tnEKEw7bHJH4L%2BwcyBF5TIPkAe9wQLoDG2IH%2B7vbpIM5MvPYfjzBbZEibCKyAmKr6BN784HCib%2BC8bhBZ5WQgh34wHbh24tRPUkJ5x6XXfvl0zb7VCnsoRLFQiAA&x-oss-signature-version=OSS4-HMAC-SHA256&x-oss-credential=STS.NZo8SXcRrWsK7ivy3itXAKeGY%2F20260906%2Feu-central-1%2Foss%2Faliyun_v4_request&x-oss-signature=233dab8b7b4060aecf0cba190d8c40d32b47362045e2275f98ec60f582b2fb12, LCSC Part Number=C1743583, Manufacturer Part Number=MFR-25FRF52-820R
R5: library part MFR-25FTE52-47K, "-55℃~+155℃ 250mW 47kΩ Metal Film Resistor ±1% ±50ppm/℃ 插件,D2.4xL6.3mm Through Hole Resistors ROHS", JLCPCB Part Number=C173021, Manufacturer=YAGEO, Package=Plugin,D2.4xL6.3mm, ComponentLink1Description=Footprint, ComponentLink1URL=https://jlc-prod-smt.oss-eu-central-1.aliyuncs.com/smtDataManualFile/8588890296134881280-C173021.pdf?response-content-disposition=attachment%3B%20filename%3DC173021.pdf%3B%20filename%2A%3DUTF-8%27%27C173021.pdf&x-oss-date=20260911T155232Z&x-oss-expires=1800&x-oss-security-token=CAISgAN1q6Ft5B2yfSjIr5r9CI7lmOhw0YeyZVLIjkcBdcR9gfOa0Dz2IHhMdHJsAOodtv0%2FmmhT6PkclqRLcbhpcmfjV%2BZHzLB8qfNbr2kg557b16cNrbH4M4H6aXeirtuwDsz9SNTCALjPD3nPii50x5bjaDymRCbLGJaViJlhHLN1Ow6jdmhpCctxLAlvo9NgFxm3D%2Fu2NQPwiWf9FVdhvhEG6Vly8qOi2MaRmFy8yFTx0b0SvJ%2BjYMrmPctoN9JnSdC5mfdzau3a1TJ84gRD0a5wkaVA1zbDs5bfISEIuUzebreLqY03dV4mOvdqIcMe8qigz88fk%2FfIioH6xyxKOexoSCnFTOiiupCcQLPyao9jLu6iayqViY7QaIOTqQohZmkAMwVOasAsI3Ngh4zF97Qt0cVNkXO9gWfLI8DtuMleWmpsRHD7MjvyAFpORa%2Bb5wchMHn6pr9EWOXuJZUIn3b%2FstWNupKq5ldctHSeoXq108CXVnU5PXYIwBNhyqKWD5sagAG1Z1Ko3snZsjO1a1IJYsOspEmZv0%2BXU7OWdkAiwCQrcVVnAyAHbGZ8aZQx2jgys%2BVPP%2BjAliJD6sDK0ERwYbIs0pE%2F%2FOGQAkhN6WXgpQltR1W2sWSdxX5ATy6ua1TtneTFxF379HftCAEbgKOmHPbiz9tzW%2FV9N%2FCwVMnmnzFeoCAA&x-oss-signature-version=OSS4-HMAC-SHA256&x-oss-credential=STS.NYHC4Qu7QfEYgtyjGTyKQn612%2F20260911%2Feu-central-1%2Foss%2Faliyun_v4_request&x-oss-signature=a5211158e981f6f286d02bf7e97af59763eebf01b0968d730475d1dfdb7d4155, LCSC Part Number=C173021, Manufacturer Part Number=MFR-25FTE52-47K
R6: library part MFR0W4F1803A50, "180kΩ 250V 250mW Metal Film Resistor ±1% ±50ppm/℃ 插件,D2.2xL6.5mm Through Hole Resistors ROHS", JLCPCB Part Number=C58666, Manufacturer="UNI-ROYAL(Uniroyal Elec)", Package=Plugin,D2.2xL6.5mm, ComponentLink1Description=Footprint, ComponentLink1URL=https://jlc-prod-smt.oss-eu-central-1.aliyuncs.com/smtDataManualFile/8588887077518131200-C58666.pdf?response-content-disposition=attachment%3B%20filename%3DC58666.pdf%3B%20filename%2A%3DUTF-8%27%27C58666.pdf&x-oss-date=20260906T133700Z&x-oss-expires=1800&x-oss-security-token=CAISgAN1q6Ft5B2yfSjIr5njeuLttaVw4q%2B4Y1bUtGEyaP1Ohojzpzz2IHhMdHJsAOodtv0%2FmmhT6PkclqRLcbhpcmfjV%2BZHzLB8qcIq%2BVsu557b16cNrbH4M4H6aXeirtuwDsz9SNTCALjPD3nPii50x5bjaDymRCbLGJaViJlhHLN1Ow6jdmhpCctxLAlvo9NgFxm3D%2Fu2NQPwiWf9FVdhvhEG6Vly8qOi2MaRmFy8yFTx0b0SvJ%2BjYMrmPctoN9JnSdC5mfdzau3a1TJ84gRD0a5wkaVA1zbDs5bfISEIuUzebreLqY03dV4mOvdqIcMe8qigz88fk%2FfIioH6xyxKOexoSCnFTOiiupCcQLPyao9jLu6iayqViY7QaIOTqQohZmkAMwVOasAsI3Ngh4zF97Qt0cVNkXO9gWfLI8DtuMleWqqk1co246HD0eS19jklBdzSlusJRAJJUVBflCeKEaRNSAd3WGhEfM2%2BBt4QT30w5N2u00S8OSMI7tiySaKWD5sagAFyBZ5nSLToOyW0z7C6S%2FMhpew6OezDiPqRMvx66XY9pS51uwdfsn2wi8yZTg9CqHuYkXf4ZXXcjvLCic5ESOd8%2FwIG4uNqRu1t5MbTbrQSd8TFmyIZT1C90epqdNW1JOA2EkooiEEU8ixLOdR1Etq5%2FomnsGPRVTeksDljQCjjiiAA&x-oss-signature-version=OSS4-HMAC-SHA256&x-oss-credential=STS.NZV1XYXzQUmSapePagdrbiMXE%2F20260906%2Feu-central-1%2Foss%2Faliyun_v4_request&x-oss-signature=4b93cb7cff9be7ef9c8b15ae901b43c734fd53e4648c1a05799116552e2faa13, LCSC Part Number=C58666, Manufacturer Part Number=MFR0W4F1803A50
R7: library part MFR-25FTE52-4K7, "-55℃~+155℃ 250mW 4.7kΩ Metal Film Resistor ±1% ±50ppm/℃ 插件,D2.4xL6.3mm Through Hole Resistors ROHS", JLCPCB Part Number=C173023, Manufacturer=YAGEO, Package=Plugin,D2.4xL6.3mm, ComponentLink1Description=Footprint, ComponentLink1URL=https://jlc-prod-smt.oss-eu-central-1.aliyuncs.com/smtDataManualFile/8771707749107277824-C173023.pdf?response-content-disposition=attachment%3B%20filename%3DC173023.pdf%3B%20filename%2A%3DUTF-8%27%27C173023.pdf&x-oss-date=20260906T110137Z&x-oss-expires=1800&x-oss-security-token=CAISgAN1q6Ft5B2yfSjIr5vSO4%2FhhZxI%2Bq2YSHX0pTQQY%2BQe2%2FboiDz2IHhMdHJsAOodtv0%2FmmhT6PkclqRLcbhpcmfjV%2BZHzLB8qZREnVcu557b16cNrbH4M4H6aXeirtuwDsz9SNTCALjPD3nPii50x5bjaDymRCbLGJaViJlhHLN1Ow6jdmhpCctxLAlvo9NgFxm3D%2Fu2NQPwiWf9FVdhvhEG6Vly8qOi2MaRmFy8yFTx0b0SvJ%2BjYMrmPctoN9JnSdC5mfdzau3a1TJ84gRD0a5wkaVA1zbDs5bfISEIuUzebreLqY03dV4mOvdqIcMe8qigz88fk%2FfIioH6xyxKOexoSCnFTOiiupCcQLPyao9jLu6iayqViY7QaIOTqQohZmkAMwVOasAsI3Ngh4zF97Qt0cVNkXO9gWfLI8DtuMleWgpiXuNG46HD0eS19jklBdzSlusJRAJJUVBflCeKEaRNSAd3WGhEfM2%2BBt4QT30w5N2u00S8OSMIYHF9RqKWD5sagAGbau%2Fxe%2BD2roMehcOdm0PLMv7W398Wd9qW6auWIGOJ8yM2mufMKnNuzKDZRrB2n8xqRfVoivNI%2BCfeVUSVLsJDjlvzZ31AQToMdhBOrAOSV9wuJpTD8m86LQRz159fZvu2CuBzwfmd%2B8wbWeOtwDoLyWx%2Bd%2F0Ka0FLrv%2FIvuL9IyAA&x-oss-signature-version=OSS4-HMAC-SHA256&x-oss-credential=STS.NXgp5UhCiMosJSEA4Eok243Cj%2F20260906%2Feu-central-1%2Foss%2Faliyun_v4_request&x-oss-signature=1116386aafb13c20a043ea06afd77c1f1d1df21e84b4082c77487c423f4e3d47, LCSC Part Number=C173023, Manufacturer Part Number=MFR-25FTE52-4K7
R8: library part MF0W4FF2704A50, "2.7MΩ 250V 250mW Metal Film Resistor ±1% ±50ppm/℃ 插件,D2.2xL6.5mm Through Hole Resistors ROHS", JLCPCB Part Number=C2991790, Manufacturer="UNI-ROYAL(Uniroyal Elec)", Package=Plugin,D2.2xL6.5mm, ComponentLink1Description=Footprint, ComponentLink1URL=https://jlc-prod-smt.oss-eu-central-1.aliyuncs.com/smtDataManualFile/8756509401370759168-C2991790.pdf?response-content-disposition=attachment%3B%20filename%3DC2991790.pdf%3B%20filename%2A%3DUTF-8%27%27C2991790.pdf&x-oss-date=20260906T100154Z&x-oss-expires=1800&x-oss-security-token=CAISgAN1q6Ft5B2yfSjIr5rWeez%2Fv7lC0IiPa1bwvEoAT71Ol5bD1zz2IHhMdHJsAOodtv0%2FmmhT6PkclqRLcbhpcmfjV%2BZHzLB8qb4bx1Eu557b16cNrbH4M4H6aXeirtuwDsz9SNTCALjPD3nPii50x5bjaDymRCbLGJaViJlhHLN1Ow6jdmhpCctxLAlvo9NgFxm3D%2Fu2NQPwiWf9FVdhvhEG6Vly8qOi2MaRmFy8yFTx0b0SvJ%2BjYMrmPctoN9JnSdC5mfdzau3a1TJ84gRD0a5wkaVA1zbDs5bfISEIuUzebreLqY03dV4mOvdqIcMe8qigz88fk%2FfIioH6xyxKOexoSCnFTOiiupCcQLPyao9jLu6iayqViY7QaIOTqQohZmkAMwVOasAsI3Ngh4zF97Qt0cVNkXO9gWfLI8DtuMleWkonxNcG46HD0eS19jklBdzSlusJRAJJUVBflCeKEaRNSAd3WGhEfM2%2BBt4QT30w5N2u00S8OSMInBxK8qKWD5sagAE4UE4gskISDgkkmUOAOqQkmxDERSgRapehmtIyqiUnmINqf%2Fe7mduu7Yr1h7WdN14VCvYzNhyIHZnwotTufqqI9gqQmPxd7MybCmWa9YrQOa6FH4HxAfg%2FPn30MZ%2BuqC8fyTltcZzXzlZfTkArX8MWh2hCnLGuQWVjeheR9INpwyAA&x-oss-signature-version=OSS4-HMAC-SHA256&x-oss-credential=STS.NYc2VKRfcgJdipAXJUC2bxSh5%2F20260906%2Feu-central-1%2Foss%2Faliyun_v4_request&x-oss-signature=efb9bb1ddd3f6f5cf4e1a357552c83cd03712dc817c5588f09d0fcc9635fb48a, LCSC Part Number=C2991790, Manufacturer Part Number=MF0W4FF2704A50
R9 R11: library part MFR-25FTF52-2K2, "-55℃~+155℃ 2.2kΩ 250mW Metal Film Resistor ±1% ±100ppm/℃ 插件,D2.4xL6.3mm Through Hole Resistors ROHS", JLCPCB Part Number=C914822, Manufacturer=YAGEO, Package=Plugin,D2.4xL6.3mm, ComponentLink1Description=Footprint, ComponentLink1URL=https://jlc-prod-smt.oss-eu-central-1.aliyuncs.com/smtDataManualFile/8590170255218667520-C914822.pdf?response-content-disposition=attachment%3B%20filename%3DC914822.pdf%3B%20filename%2A%3DUTF-8%27%27C914822.pdf&x-oss-date=20260906T110901Z&x-oss-expires=1800&x-oss-security-token=CAISgAN1q6Ft5B2yfSjIr5vSO4%2FhhZxI%2Bq2YSHX0pTQQY%2BQe2%2FboiDz2IHhMdHJsAOodtv0%2FmmhT6PkclqRLcbhpcmfjV%2BZHzLB8qZREnVcu557b16cNrbH4M4H6aXeirtuwDsz9SNTCALjPD3nPii50x5bjaDymRCbLGJaViJlhHLN1Ow6jdmhpCctxLAlvo9NgFxm3D%2Fu2NQPwiWf9FVdhvhEG6Vly8qOi2MaRmFy8yFTx0b0SvJ%2BjYMrmPctoN9JnSdC5mfdzau3a1TJ84gRD0a5wkaVA1zbDs5bfISEIuUzebreLqY03dV4mOvdqIcMe8qigz88fk%2FfIioH6xyxKOexoSCnFTOiiupCcQLPyao9jLu6iayqViY7QaIOTqQohZmkAMwVOasAsI3Ngh4zF97Qt0cVNkXO9gWfLI8DtuMleWgpiXuNG46HD0eS19jklBdzSlusJRAJJUVBflCeKEaRNSAd3WGhEfM2%2BBt4QT30w5N2u00S8OSMIYHF9RqKWD5sagAGbau%2Fxe%2BD2roMehcOdm0PLMv7W398Wd9qW6auWIGOJ8yM2mufMKnNuzKDZRrB2n8xqRfVoivNI%2BCfeVUSVLsJDjlvzZ31AQToMdhBOrAOSV9wuJpTD8m86LQRz159fZvu2CuBzwfmd%2B8wbWeOtwDoLyWx%2Bd%2F0Ka0FLrv%2FIvuL9IyAA&x-oss-signature-version=OSS4-HMAC-SHA256&x-oss-credential=STS.NXgp5UhCiMosJSEA4Eok243Cj%2F20260906%2Feu-central-1%2Foss%2Faliyun_v4_request&x-oss-signature=2d286e58a8ba73440a7beae8dc6ddb285cadd131f4dc8e611f405a437f75ed31, LCSC Part Number=C914822, Manufacturer Part Number=MFR-25FTF52-2K2
R10: library part MFR-25FBF52-20K, "-55℃~+155℃ 20kΩ 250mW Metal Film Resistor ±1% ±100ppm/℃ 插件,D2.4xL6.3mm Through Hole Resistors ROHS", JLCPCB Part Number=C1364283, Manufacturer=YAGEO, Package=Plugin,D2.4xL6.3mm, ComponentLink1Description=Footprint, ComponentLink1URL=https://jlc-prod-smt.oss-eu-central-1.aliyuncs.com/smtDataManualFile/8755389697101582336-C1364283.pdf?response-content-disposition=attachment%3B%20filename%3DC1364283.pdf%3B%20filename%2A%3DUTF-8%27%27C1364283.pdf&x-oss-date=20260906T134114Z&x-oss-expires=1800&x-oss-security-token=CAISgAN1q6Ft5B2yfSjIr5njeuLttaVw4q%2B4Y1bUtGEyaP1Ohojzpzz2IHhMdHJsAOodtv0%2FmmhT6PkclqRLcbhpcmfjV%2BZHzLB8qcIq%2BVsu557b16cNrbH4M4H6aXeirtuwDsz9SNTCALjPD3nPii50x5bjaDymRCbLGJaViJlhHLN1Ow6jdmhpCctxLAlvo9NgFxm3D%2Fu2NQPwiWf9FVdhvhEG6Vly8qOi2MaRmFy8yFTx0b0SvJ%2BjYMrmPctoN9JnSdC5mfdzau3a1TJ84gRD0a5wkaVA1zbDs5bfISEIuUzebreLqY03dV4mOvdqIcMe8qigz88fk%2FfIioH6xyxKOexoSCnFTOiiupCcQLPyao9jLu6iayqViY7QaIOTqQohZmkAMwVOasAsI3Ngh4zF97Qt0cVNkXO9gWfLI8DtuMleWqqk1co246HD0eS19jklBdzSlusJRAJJUVBflCeKEaRNSAd3WGhEfM2%2BBt4QT30w5N2u00S8OSMI7tiySaKWD5sagAFyBZ5nSLToOyW0z7C6S%2FMhpew6OezDiPqRMvx66XY9pS51uwdfsn2wi8yZTg9CqHuYkXf4ZXXcjvLCic5ESOd8%2FwIG4uNqRu1t5MbTbrQSd8TFmyIZT1C90epqdNW1JOA2EkooiEEU8ixLOdR1Etq5%2FomnsGPRVTeksDljQCjjiiAA&x-oss-signature-version=OSS4-HMAC-SHA256&x-oss-credential=STS.NZV1XYXzQUmSapePagdrbiMXE%2F20260906%2Feu-central-1%2Foss%2Faliyun_v4_request&x-oss-signature=5255ac2965f6fd3f7ed1f8f768bc2b1677833e959dab1a4e0f80f99292c53270, LCSC Part Number=C1364283, Manufacturer Part Number=MFR-25FBF52-20K
R12: library part MFR-25FBF52-200K, "-55℃~+155℃ 200kΩ 250mW Metal Film Resistor ±1% ±100ppm/℃ 插件,D2.4xL6.3mm Through Hole Resistors ROHS", JLCPCB Part Number=C1364207, Manufacturer=YAGEO, Package=Plugin,D2.4xL6.3mm, ComponentLink1Description=Footprint, ComponentLink1URL=https://jlc-prod-smt.oss-eu-central-1.aliyuncs.com/smtDataManualFile/8755389661554855936-C1364207.pdf?response-content-disposition=attachment%3B%20filename%3DC1364207.pdf%3B%20filename%2A%3DUTF-8%27%27C1364207.pdf&x-oss-date=20260906T100636Z&x-oss-expires=1800&x-oss-security-token=CAISgAN1q6Ft5B2yfSjIr5rWeez%2Fv7lC0IiPa1bwvEoAT71Ol5bD1zz2IHhMdHJsAOodtv0%2FmmhT6PkclqRLcbhpcmfjV%2BZHzLB8qb4bx1Eu557b16cNrbH4M4H6aXeirtuwDsz9SNTCALjPD3nPii50x5bjaDymRCbLGJaViJlhHLN1Ow6jdmhpCctxLAlvo9NgFxm3D%2Fu2NQPwiWf9FVdhvhEG6Vly8qOi2MaRmFy8yFTx0b0SvJ%2BjYMrmPctoN9JnSdC5mfdzau3a1TJ84gRD0a5wkaVA1zbDs5bfISEIuUzebreLqY03dV4mOvdqIcMe8qigz88fk%2FfIioH6xyxKOexoSCnFTOiiupCcQLPyao9jLu6iayqViY7QaIOTqQohZmkAMwVOasAsI3Ngh4zF97Qt0cVNkXO9gWfLI8DtuMleWkonxNcG46HD0eS19jklBdzSlusJRAJJUVBflCeKEaRNSAd3WGhEfM2%2BBt4QT30w5N2u00S8OSMInBxK8qKWD5sagAE4UE4gskISDgkkmUOAOqQkmxDERSgRapehmtIyqiUnmINqf%2Fe7mduu7Yr1h7WdN14VCvYzNhyIHZnwotTufqqI9gqQmPxd7MybCmWa9YrQOa6FH4HxAfg%2FPn30MZ%2BuqC8fyTltcZzXzlZfTkArX8MWh2hCnLGuQWVjeheR9INpwyAA&x-oss-signature-version=OSS4-HMAC-SHA256&x-oss-credential=STS.NYc2VKRfcgJdipAXJUC2bxSh5%2F20260906%2Feu-central-1%2Foss%2Faliyun_v4_request&x-oss-signature=8ee0dc9ba41a664903cf3965d51a3b18424dbbdc6187841ff3272000787afc55, LCSC Part Number=C1364207, Manufacturer Part Number=MFR-25FBF52-200K
R13 R14: library part MFR-25FTE52-100K, "-55℃~+155℃ 100kΩ 250mW Metal Film Resistor ±1% ±50ppm/℃ 插件,D2.4xL6.3mm Through Hole Resistors ROHS", JLCPCB Part Number=C172965, Manufacturer=YAGEO, Package=Plugin,D2.4xL6.3mm, ComponentLink1Description=Footprint, ComponentLink1URL=https://jlc-prod-smt.oss-eu-central-1.aliyuncs.com/smtDataManualFile/8755418925352140800-C172965.pdf?response-content-disposition=attachment%3B%20filename%3DC172965.pdf%3B%20filename%2A%3DUTF-8%27%27C172965.pdf&x-oss-date=20260906T100955Z&x-oss-expires=1800&x-oss-security-token=CAISgAN1q6Ft5B2yfSjIr5rWeez%2Fv7lC0IiPa1bwvEoAT71Ol5bD1zz2IHhMdHJsAOodtv0%2FmmhT6PkclqRLcbhpcmfjV%2BZHzLB8qb4bx1Eu557b16cNrbH4M4H6aXeirtuwDsz9SNTCALjPD3nPii50x5bjaDymRCbLGJaViJlhHLN1Ow6jdmhpCctxLAlvo9NgFxm3D%2Fu2NQPwiWf9FVdhvhEG6Vly8qOi2MaRmFy8yFTx0b0SvJ%2BjYMrmPctoN9JnSdC5mfdzau3a1TJ84gRD0a5wkaVA1zbDs5bfISEIuUzebreLqY03dV4mOvdqIcMe8qigz88fk%2FfIioH6xyxKOexoSCnFTOiiupCcQLPyao9jLu6iayqViY7QaIOTqQohZmkAMwVOasAsI3Ngh4zF97Qt0cVNkXO9gWfLI8DtuMleWkonxNcG46HD0eS19jklBdzSlusJRAJJUVBflCeKEaRNSAd3WGhEfM2%2BBt4QT30w5N2u00S8OSMInBxK8qKWD5sagAE4UE4gskISDgkkmUOAOqQkmxDERSgRapehmtIyqiUnmINqf%2Fe7mduu7Yr1h7WdN14VCvYzNhyIHZnwotTufqqI9gqQmPxd7MybCmWa9YrQOa6FH4HxAfg%2FPn30MZ%2BuqC8fyTltcZzXzlZfTkArX8MWh2hCnLGuQWVjeheR9INpwyAA&x-oss-signature-version=OSS4-HMAC-SHA256&x-oss-credential=STS.NYc2VKRfcgJdipAXJUC2bxSh5%2F20260906%2Feu-central-1%2Foss%2Faliyun_v4_request&x-oss-signature=a5c55aa19f9a7a777347e665f5e32691cf02c8186d1a0df1a4a6816c34bb2bbb, LCSC Part Number=C172965, Manufacturer Part Number=MFR-25FTE52-100K
U1: "Low-offset voltage (0.25 mV) single operational amplifier /  / -18V~-3V、3V~18V 0.3V/us 0℃~+70℃ 1 1.8nA 10.5nV/√Hz@10Hz 120dB 500nV/℃ 600kHz 60uV 800pA Built-in compensation PDIP-8 Precision Op Amps ROHS", JLCPCB Part Number=C5224, Package="PDIP-8 Texas", Check_prices=https://www.snapeda.com/parts/OP07CP/Texas+Instruments/view-part/?ref=eda, LCSC Part Number=C5224, MF="Texas Instruments", MP=OP07CP, Packaging=PDIP-8, SnapEDA_Link=https://www.snapeda.com/parts/OP07CP/Texas+Instruments/view-part/?ref=snap
U2 U3: library part TL072CPE4, "Dual Low-Noise JFET-Input General-Purpose Operational Amplifier 8-PDIP 0 to 70 /  / -15V~15V 0℃~+70℃ 1.4mA 100pA 13V/us 18nV/√Hz@1kHz 18uV/℃ 2 3MHz 3mV 65pA 70dB Short-Circuit  Protection、Built-in compensation、Latch-up suppression PDIP-8 FET Input Amplifiers ROHS", JLCPCB Part Number=C7236, Package="PDIP-8 Texas", Check_prices=https://www.snapeda.com/parts/TL072CPE4/Texas+Instruments/view-part/?ref=eda, ComponentLink1Description=Datasheet, ComponentLink1URL=https://www.ti.com/cn/lit/gpn/tl072, LCSC Part Number=C7236, MF="Texas Instruments", MP=TL072CPE4, Packaging=PDIP-8, SnapEDA_Link=https://www.snapeda.com/parts/TL072CPE4/Texas+Instruments/view-part/?ref=snap
VR1: library part 3296W-1-104LF, "100kΩ 25 500mW ±10% ±100ppm/℃ SIP-3P,9.5x4.8mm Potentiometers, Variable Resistors ROHS", JLCPCB Part Number=C48084, Package="NON STANDARD-3 Bourns", Check_prices=https://www.snapeda.com/parts/3296W-1-104LF/Bourns/view-part/?ref=eda, ComponentLink1Description=Datasheet, ComponentLink1URL=https://jlc-prod-smt.oss-eu-central-1.aliyuncs.com/smtDataManualFile/8588893908663750656-C48084.pdf?response-content-disposition=attachment%3B%20filename%3DC48084.pdf%3B%20filename%2A%3DUTF-8%27%27C48084.pdf&x-oss-date=20260906T142126Z&x-oss-expires=1800&x-oss-security-token=CAISgAN1q6Ft5B2yfSjIr5vDKo7hpqpL7ozYQxH7t1c3O8QVrb3NqTz2IHhMdHJsAOodtv0%2FmmhT6PkclqRLcbhpcmfjV%2BZHzLB8qfdWt1ku557b16cNrbH4M4H6aXeirtuwDsz9SNTCALjPD3nPii50x5bjaDymRCbLGJaViJlhHLN1Ow6jdmhpCctxLAlvo9NgFxm3D%2Fu2NQPwiWf9FVdhvhEG6Vly8qOi2MaRmFy8yFTx0b0SvJ%2BjYMrmPctoN9JnSdC5mfdzau3a1TJ84gRD0a5wkaVA1zbDs5bfISEIuUzebreLqY03dV4mOvdqIcMe8qigz88fk%2FfIioH6xyxKOexoSCnFTOiiupCcQLPyao9jLu6iayqViY7QaIOTqQohZmkAMwVOasAsI3Ngh4zF97Qt0cVNkXO9gWfLI8DtuMleWmruE1jHLjvyAFpORa%2Bb5wchMHn6pr9EWOXuJZUIn3b%2FstWNupKq5ldctHSeoXq108CXVnU5PXYIP5O%2FGqKWD5sagAGyCrekBlsAT2FIxnm2MFOfLvd42oLE35rahSki9MPf3JcF5R%2F2Pfjmxez%2FjkCAK0aFrjFaj3CSznQwV4nVyOW6qUasOSwt61YhmjGTlCj%2BP4Dbyptjc%2BuN2YwpfEu1vnEtwpWw8TnDzSvJxj8n9Q9IsE8jxxBqX9wwDPa6q0GrISAA&x-oss-signature-version=OSS4-HMAC-SHA256&x-oss-credential=STS.NXva4UKujYN3A7JSWb7K9BxfK%2F20260906%2Feu-central-1%2Foss%2Faliyun_v4_request&x-oss-signature=e75ac0ab24145842701765cd8d6799db0728ff79845541a77d28db743b53723d, LCSC Part Number=C48084, MF=Bourns, MP=3296W-1-104LF, Packaging=SIP-3P,9.5x4.8mm, SnapEDA_Link=https://www.snapeda.com/parts/3296W-1-104LF/Bourns/view-part/?ref=snap
VR2: library part 3296W-1-101, "TRIMMER - 3/8in SQ MT CERMET", JLCPCB Part Number=C118961, Package="NON STANDARD-3 Bourns", Check_prices=https://www.snapeda.com/parts/3296W-1-101/Bourns/view-part/?ref=eda, ComponentLink1Description=Datasheet, ComponentLink1URL=https://jlc-prod-smt.oss-eu-central-1.aliyuncs.com/smtDataManualFile/8588896635821047808-C118961.pdf?response-content-disposition=attachment%3B%20filename%3DC118961.pdf%3B%20filename%2A%3DUTF-8%27%27C118961.pdf&x-oss-date=20260825T065028Z&x-oss-expires=1800&x-oss-security-token=CAISgAN1q6Ft5B2yfSjIr5vsH%2Bv%2Bj61n%2FY%2BtSUvftkM2ed9mmpXn2jz2IHhMdHJsAOodtv0%2FmmhT6PkclqRLcbhpcmfjV%2BZHzLB8qfIAvCIq557b16cNrbH4M4H6aXeirtuwDsz9SNTCALjPD3nPii50x5bjaDymRCbLGJaViJlhHLN1Ow6jdmhpCctxLAlvo9NgFxm3D%2Fu2NQPwiWf9FVdhvhEG6Vly8qOi2MaRmFy8yFTx0b0SvJ%2BjYMrmPctoN9JnSdC5mfdzau3a1TJ84gRD0a5wkaVA1zbDs5bfISEIuUzebreLqY03dV4mOvdqIcMe8qigz88fk%2FfIioH6xyxKOexoSCnFTOiiupCcQLPyao9jLu6iayqViY7QaIOTqQohZmkAMwVOasAsI3Ngh4zF97Qt0cVNkXO9gWfLI8DtuMleWmrEeI03TPZqaIWzHOTEFupYY7CDV2HC3D82fcxJ2B%2Bmz7zwy%2B%2Fdqxot7SHZVvl3SE4LlO17v1wIjJpoQqKWD5sagAEgdpkFxWJfWGt8%2F63pzZ6QCF2D5PIsDyEDGRhRAOPE3zY45FgkFp0%2Fzihou7nTmAgt%2BxuLJa5KGSSYWT4u%2B14DP%2Fw6JDR%2BJpTEGE5c%2F7VzgQgnXPa1oCnwAziP93%2BDx0Oh32OxCXeo0CBC5AmLuwuDf7AeuIREBiyb%2BltzpAJuYCAA&x-oss-signature-version=OSS4-HMAC-SHA256&x-oss-credential=STS.NXYTQJbrFJMFKmnRCcuPJuPL8%2F20260825%2Feu-central-1%2Foss%2Faliyun_v4_request&x-oss-signature=4c43236ed8371185a92c99f50fcf807b2f7a1b72fcadc9d556e75dc3d55ed87c, LCSC Part Number=C118961, MF=Bourns, MP=3296W-1-101, Packaging=Plugin-3P,9.5x4.9mm, SnapEDA_Link=https://www.snapeda.com/parts/3296W-1-101/Bourns/view-part/?ref=snap

## Free pads (board coordinates)
  round 1.524 smd: 5(38.49,89.437) 6(39.043,114.018) 7(86.965,78.718) 8(115.56,95.905) 10(60.802,105.866) 11(72.973,101.138)
  round 6 hole 3.2 unplated: MH1(29.676,122.669) MH2(29.727,71.065) MH3(121.343,122.695)
  round 6 hole 3.2: MH4(121.339,71.118)

## Via types
v1: diameter 0.6, hole 0.3, Top Layer to Bottom Layer, 280 vias

## Nets (pads, with @x,y where several pads share a name; then routed paths per layer and width w, separated by ;. In a path a pad name is that pad's centre, name@x,y a point inside that pad or via, vN(x,y) a via of type N, cw(c..) or ccw(c..) an arc to the next point about the centre after c; other vN are vias at no path point)
+9V: C1.2 C3.2 C6.2 J3.1 J9.2 pad.5 R5.1 R6.2 R7.1 R11.1 U1.7 U2.8 U3.8 | length 190.5
  Top Layer w0.61: pad.5 37.246,90.388 v1(37.246,93.297) 37.232,93.283 32.171,93.283 J9.2 34.996,87.249 35.408,86.837 35.408,85.478 36.479,84.407 R7.1 41.147,84.407 43.324,82.231 56.817,82.231 R6.2 ; R5.1 59.723,109.264 65.277,109.264 66.603,107.938 v1(66.603,107.207) 72.356,107.207 73.269,106.294 ; U3.8 71,104.41 71.547,104.956 73.146,104.956 C6.2 ; R11.1 73.445,111.095 73.445,105.009 C6.2 ; U2.8 95.659,104.407 96.116,104.863 C3.2 ; v1(108.717,119.171) 108.717,120.167 J3.1 ; v1(110.028,104.362) 110.028,103.156 111.275,101.909 112.325,101.909 U1.7 112.523,101.852 112.819,102.147 C1.2 115.145,104.776 113.342,106.579 99.989,106.579 98.274,104.863 C3.2 ; C6.2 73.434,104.833 75.18,106.579 97.391,106.579 98.038,105.931 98.038,104.934 C3.2
  Bottom Layer w0.61: v1(37.246,93.297) 40.014,96.065 40.014,105.917 41.323,107.226 65.596,107.226 65.614,107.207 v1(66.603,107.207) ; v1(108.717,119.171) 108.717,109.723 110.067,108.373 110.067,104.401 v1(110.028,104.362)
-9V: C2.1 C4.1 C7.1 J8.2 pad.6 R9.1 R14.2 U1.4 U2.4 U3.4 | length 123.8
  Top Layer w0.61: J8.2 32.002,107.337 37.954,107.337 R14.2 ; pad.6 38.03,113.04 38.03,107.261 R14.2 ; U3.4 62.779,96.79 62.312,96.323 C7.1 ; U2.4 87.437,96.787 86.966,96.315 C4.1 84.986,95.163 ; R9.1 113.359,81.569 112.08,81.569 111.482,82.168 111.482,85.791 106.002,91.27 106.002,95.212 U1.4 104.302,96.772 103.843,96.314 C2.1 101.916,95.064 101.416,94.563 85.586,94.563 84.986,95.163 ; R14.2 40.112,109.33 51.519,109.33 52.874,107.974 52.874,100.653 54.923,98.604 56.684,98.604 58.965,96.323 C7.1 ; C7.1 60.341,95.229 60.991,94.579 84.402,94.579 84.986,95.163
BAT_SCALE: J5.2 R6.1 R10.2 | length 22.2
  Top Layer w0.305: R6.1 R10.2 62.643,70.059 75.566,70.059 76.418,70.911 76.418,72.659 J5.2
COMMON: J5.1 R2.1 | length 29.1
  Top Layer w0.305: J5.1 73.925,75.276 v1(73.925,78.351) ; v1(74.55,96.11) 76.07,96.11 77.172,97.212 R2.1
  Bottom Layer w0.305: v1(73.925,78.351) 73.925,95.508 74.528,96.11 v1(74.55,96.11)
DH60: J3.2 Q1.3 | length 18
  Top Layer w0.305: J3.2 105.481,119.288 107.814,116.955 112.012,116.955 113.286,115.681 113.286,115.535 v1(113.328,115.493) ; v1(113.252,111.85) 113.987,111.115 Q1.3
  Bottom Layer w0.305: v1(113.252,111.85) 113.29,111.888 113.29,115.455 v1(113.328,115.493)
GND: C1.1 C2.2 C3.1 C4.2 C5.1 C6.1 C7.2 C8.1 J1.2 J6.2 J7.2 Q3.1 R3.1 R4.1 R10.1 R13.1 R15.1